# Altium PCB PCB1.PcbDoc (part 4 of 5)
Units mm, origin at the board's own origin, x right, y up, seen from the top; angles counter-clockwise.
Board outline 50 x 70 mm, 6 copper layers (Top Layer, L2, L3, L4, L5, Bottom Layer), stack 1.232 mm thick; 119 components, 75 nets, 612 pads, 243 vias.
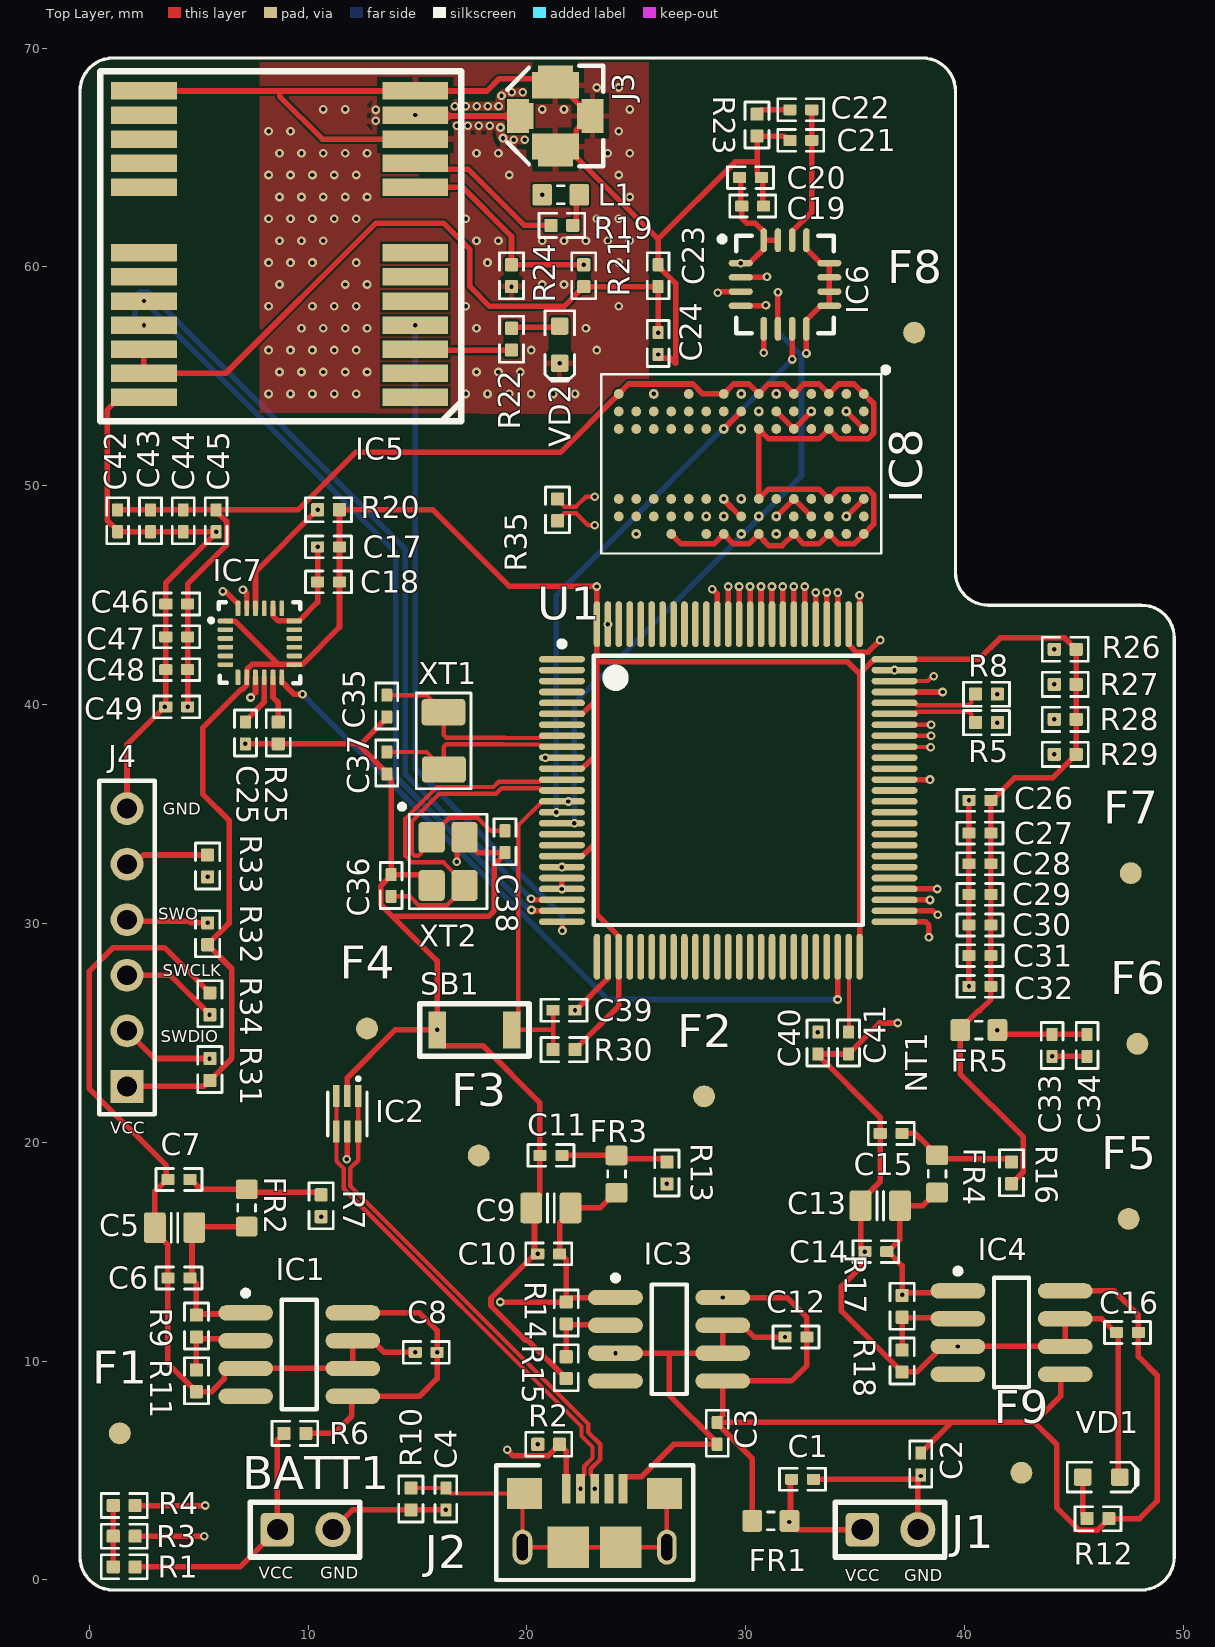
[diagram p0: Top Layer view]

## Part data (continued)
R15 R18: library part Res, "Res Thick Film 0402 5.9K Ohm 1% 0.063W ±100ppm/°C Molded SMD Paper T/R", Case Code (Imperial)=0402, Case Code (Metric)=1005, Manufacturer="Stackpole Electronics", Manufacturer Part Number=RMCF0402FT5K90, Max Operating Temperature=155°C, Max Power Dissipation=63mW, Min Operating Temperature=-55°C, Ratings=AEC-Q200, Temperature Coefficient=100ppm/°C, Tolerance=1%, Voltage Rating=50V, Case/Package=0402, Category="Chip SMD Resistors", China RoHS=Non-Compliant, ComponentLink1Description=https://datasheet.octopart.com:443/RMCF0402FT5K90-Stackpole-Electronics-datasheet-182148065.pdf?src-supplier=IHS, ComponentLink1URL=https://datasheet.octopart.com:443/RMCF0402FT5K90-Stackpole-Electronics-datasheet-182148065.pdf?src-supplier=IHS, ComponentLink2Description=https://datasheet.octopart.com:443/RMCF0402FT5K90-Stackpole-Electronics-datasheet-28504820.pdf?src-supplier=Upverter, ComponentLink2URL=https://datasheet.octopart.com:443/RMCF0402FT5K90-Stackpole-Electronics-datasheet-28504820.pdf?src-supplier=Upverter, ComponentLink3Description=https://datasheet.octopart.com:443/RMCF0402FT5K90-Stackpole-Electronics-datasheet-141193804.pdf?src-supplier=Master+Electronics, ComponentLink3URL=https://datasheet.octopart.com:443/RMCF0402FT5K90-Stackpole-Electronics-datasheet-141193804.pdf?src-supplier=Master+Electronics, ComponentLink4Description=https://datasheet.octopart.com:443/RMCF0402FT5K90-Stackpole-Electronics-datasheet-116606903.pdf?src-supplier=Master+Electronics, ComponentLink4URL=https://datasheet.octopart.com:443/RMCF0402FT5K90-Stackpole-Electronics-datasheet-116606903.pdf?src-supplier=Master+Electronics, ComponentLink5Description=https://datasheet.octopart.com:443/RMCF0402FT5K90-Stackpole-Electronics-datasheet-189104163.pdf?src-supplier=Master+Electronics, ComponentLink5URL=https://datasheet.octopart.com:443/RMCF0402FT5K90-Stackpole-Electronics-datasheet-189104163.pdf?src-supplier=Master+Electronics, ComponentLink6Description=https://datasheet.octopart.com:443/RMCF0402FT5K90-Stackpole-Electronics-datasheet-62091608.pdf?src-supplier=Stackpole+Electronics, ComponentLink6URL=https://datasheet.octopart.com:443/RMCF0402FT5K90-Stackpole-Electronics-datasheet-62091608.pdf?src-supplier=Stackpole+Electronics, ComponentLink7Description=https://datasheet.octopart.com:443/RMCF0402FT5K90-Stackpole-Electronics-datasheet-12534581.pdf?src-supplier=Stackpole+Electronics, ComponentLink7URL=https://datasheet.octopart.com:443/RMCF0402FT5K90-Stackpole-Electronics-datasheet-12534581.pdf?src-supplier=Stackpole+Electronics, ComponentLink8Description=https://datasheet.octopart.com:443/RMCF0402FT5K90-Stackpole-Electronics-datasheet-10788263.pdf?src-supplier=Stackpole+Electronics, ComponentLink8URL=https://datasheet.octopart.com:443/RMCF0402FT5K90-Stackpole-Electronics-datasheet-10788263.pdf?src-supplier=Stackpole+Electronics, ComponentLink9Description=http://sigma.octopart.com:80/15940719/materials_sheet/Stackpole-Electronics-RMCF0402FT5K90.pdf?src-supplier=Compliance+Statements, ComponentLink9URL=http://sigma.octopart.com:80/15940719/materials_sheet/Stackpole-Electronics-RMCF0402FT5K90.pdf?src-supplier=Compliance+Statements, ComponentLink10Description=http://sigma.octopart.com:80/141158211/reach_statement/Stackpole-Electronics-RMCF0402FT5K90.pdf?src-supplier=Compliance+Statements, ComponentLink10URL=http://sigma.octopart.com:80/141158211/reach_statement/Stackpole-Electronics-RMCF0402FT5K90.pdf?src-supplier=Compliance+Statements, ComponentLink11Description=http://sigma.octopart.com:80/141158212/rohs_statement/Stackpole-Electronics-RMCF0402FT5K90.pdf?src-supplier=Compliance+Statements, ComponentLink11URL=http://sigma.octopart.com:80/141158212/rohs_statement/Stackpole-Electronics-RMCF0402FT5K90.pdf?src-supplier=Compliance+Statements, Composition="Thick Film", Contact Plating=Tin, Country of Origin="Japan, Mainland China, Taiwan", Export Control Classification Number (ECCN) Code=EAR99, Features="Automotive AEC-Q200", Harmonized Tariff Schedule (HTS) Code=8533.21.00.30, Height=300µm, Introduction Date=2011-01-07, Lead Free="Lead Free", Length=1mm, Lifecycle Status=Production, Mounting Technology="Surface Mount", Number of Terminals=2, Number of Terminations=2, Packaging="Cut Tape (CT)", Power Rating=63mW, Pricing="1=0.044, 10=0.0049, 25=0.003, 100=0.0026, 250=0.0022, 500=0.0017, 3000=0.0014, 6000=0.0008 (USD)", Radiation Hardening=No, REACH SVHC=Yes, RoHS=Compliant, Schedule B="8533210045, 8533210045|8533210045|8533210045|8533210045|8533210045", Stock=6359, Supplier="Arrow Electronics", Supplier Part Number=RMCF0402FT5K90, Width=500µm, Working Voltage=50V
R19: library part Res, "Res Thick Film 0402 10 Ohm 1% 0.063W(1/16W) ±100ppm/C Pad SMD Automotive T/R", Case Code (Imperial)=0402, Case Code (Metric)=1005, Manufacturer="Stackpole Electronics", Manufacturer Part Number=RMCF0402FT10R0, Max Operating Temperature=155°C, Max Power Dissipation=63mW, Min Operating Temperature=-55°C, Ratings=AEC-Q200, Temperature Coefficient=100ppm/°C, Tolerance=1%, Voltage Rating=50V, Case/Package=0402, Category="Chip SMD Resistors", China RoHS=Non-Compliant, ComponentLink1Description=https://datasheet.octopart.com:443/RMCF0402FT10R0-Stackpole-Electronics-datasheet-182148065.pdf?src-supplier=IHS, ComponentLink1URL=https://datasheet.octopart.com:443/RMCF0402FT10R0-Stackpole-Electronics-datasheet-182148065.pdf?src-supplier=IHS, ComponentLink2Description=https://datasheet.octopart.com:443/RMCF0402FT10R0-Stackpole-Electronics-datasheet-141193804.pdf?src-supplier=Master+Electronics, ComponentLink2URL=https://datasheet.octopart.com:443/RMCF0402FT10R0-Stackpole-Electronics-datasheet-141193804.pdf?src-supplier=Master+Electronics, ComponentLink3Description=https://datasheet.octopart.com:443/RMCF0402FT10R0-Stackpole-Electronics-datasheet-189104163.pdf?src-supplier=Master+Electronics, ComponentLink3URL=https://datasheet.octopart.com:443/RMCF0402FT10R0-Stackpole-Electronics-datasheet-189104163.pdf?src-supplier=Master+Electronics, ComponentLink4Description=https://datasheet.octopart.com:443/RMCF0402FT10R0-Stackpole-Electronics-datasheet-116606903.pdf?src-supplier=Master+Electronics, ComponentLink4URL=https://datasheet.octopart.com:443/RMCF0402FT10R0-Stackpole-Electronics-datasheet-116606903.pdf?src-supplier=Master+Electronics, ComponentLink5Description=https://datasheet.octopart.com:443/RMCF0402FT10R0-Stackpole-Electronics-datasheet-62091608.pdf?src-supplier=Upverter, ComponentLink5URL=https://datasheet.octopart.com:443/RMCF0402FT10R0-Stackpole-Electronics-datasheet-62091608.pdf?src-supplier=Upverter, ComponentLink6Description=https://datasheet.octopart.com:443/RMCF0402FT10R0-Stackpole-Electronics-datasheet-28504820.pdf?src-supplier=Upverter, ComponentLink6URL=https://datasheet.octopart.com:443/RMCF0402FT10R0-Stackpole-Electronics-datasheet-28504820.pdf?src-supplier=Upverter, ComponentLink7Description=https://datasheet.octopart.com:443/RMCF0402FT10R0-Stackpole-Electronics-datasheet-12534581.pdf?src-supplier=Stackpole+Electronics, ComponentLink7URL=https://datasheet.octopart.com:443/RMCF0402FT10R0-Stackpole-Electronics-datasheet-12534581.pdf?src-supplier=Stackpole+Electronics, ComponentLink8Description=https://datasheet.octopart.com:443/RMCF0402FT10R0-Stackpole-Electronics-datasheet-10788263.pdf?src-supplier=Stackpole+Electronics, ComponentLink8URL=https://datasheet.octopart.com:443/RMCF0402FT10R0-Stackpole-Electronics-datasheet-10788263.pdf?src-supplier=Stackpole+Electronics, ComponentLink9Description=https://datasheet.octopart.com:443/RMCF0402FT10R0-Stackpole-Electronics-datasheet-12510902.pdf?src-supplier=Future+Electronics, ComponentLink9URL=https://datasheet.octopart.com:443/RMCF0402FT10R0-Stackpole-Electronics-datasheet-12510902.pdf?src-supplier=Future+Electronics, ComponentLink10Description=http://sigma.octopart.com:80/15940719/materials_sheet/Stackpole-Electronics-RMCF0402FT10R0.pdf?src-supplier=Compliance+Statements, ComponentLink10URL=http://sigma.octopart.com:80/15940719/materials_sheet/Stackpole-Electronics-RMCF0402FT10R0.pdf?src-supplier=Compliance+Statements, ComponentLink11Description=http://sigma.octopart.com:80/141158211/reach_statement/Stackpole-Electronics-RMCF0402FT10R0.pdf?src-supplier=Compliance+Statements, ComponentLink11URL=http://sigma.octopart.com:80/141158211/reach_statement/Stackpole-Electronics-RMCF0402FT10R0.pdf?src-supplier=Compliance+Statements, ComponentLink12Description=http://sigma.octopart.com:80/141158212/rohs_statement/Stackpole-Electronics-RMCF0402FT10R0.pdf?src-supplier=Compliance+Statements, ComponentLink12URL=http://sigma.octopart.com:80/141158212/rohs_statement/Stackpole-Electronics-RMCF0402FT10R0.pdf?src-supplier=Compliance+Statements, Composition="Thick Film", Contact Plating=Tin, Country of Origin="Japan, Mainland China, Taiwan", Depth=500µm, Export Control Classification Number (ECCN) Code=EAR99, Features="Automotive AEC-Q200", Harmonized Tariff Schedule (HTS) Code=8533.21.00.30, Height=300µm, Introduction Date=2011-01-07, Lead Free="Lead Free", Length=1mm, Lifecycle Status=Production, Military Standard=Not, Mounting Technology="Surface Mount", Number of Terminals=2, Number of Terminations=2, Packaging="Cut Tape (CT)", Power Rating=63mW, Pricing="60000=0.0016 (USD)", Radiation Hardening=No, REACH SVHC=Yes, RoHS=Compliant, Schedule B="8533210045, 8533210045|8533210045|8533210045|8533210045|8533210045|8533210045|8533210045|8533210045|8533210045|8533210045|8533210045|8533210045|8533210045|8533210045|8533210045|8533210045|8533210045|8533210045|8533210045|8533210045|8533210045|8533210045|8533210045|85", Stock=180000, Supplier="Arrow Electronics", Supplier Part Number=RMCF0402FT10R0, Width=500µm, Working Voltage=50V
R35: library part Res, "Res Thick Film 0402 100 Ohm 1% 0.063W(1/16W) ±100ppm/C Pad SMD Automotive T/R", Case Code (Imperial)=0402, Case Code (Metric)=1005, Manufacturer="Stackpole Electronics", Manufacturer Part Number=RMCF0402FT100R, Max Operating Temperature=155°C, Max Power Dissipation=63mW, Min Operating Temperature=-55°C, Ratings=AEC-Q200, Temperature Coefficient=100ppm/°C, Tolerance=1%, Voltage Rating=50V, Case/Package=0402, Category="Chip SMD Resistors", China RoHS=Non-Compliant, ComponentLink1Description=https://datasheet.octopart.com:443/RMCF0402FT100R-Stackpole-Electronics-datasheet-182148065.pdf?src-supplier=IHS, ComponentLink1URL=https://datasheet.octopart.com:443/RMCF0402FT100R-Stackpole-Electronics-datasheet-182148065.pdf?src-supplier=IHS, ComponentLink2Description=https://datasheet.octopart.com:443/RMCF0402FT100R-Stackpole-Electronics-datasheet-141193804.pdf?src-supplier=Upverter, ComponentLink2URL=https://datasheet.octopart.com:443/RMCF0402FT100R-Stackpole-Electronics-datasheet-141193804.pdf?src-supplier=Upverter, ComponentLink3Description=https://datasheet.octopart.com:443/RMCF0402FT100R-Stackpole-Electronics-datasheet-62091608.pdf?src-supplier=Upverter, ComponentLink3URL=https://datasheet.octopart.com:443/RMCF0402FT100R-Stackpole-Electronics-datasheet-62091608.pdf?src-supplier=Upverter, ComponentLink4Description=https://datasheet.octopart.com:443/RMCF0402FT100R-Stackpole-Electronics-datasheet-28504820.pdf?src-supplier=Upverter, ComponentLink4URL=https://datasheet.octopart.com:443/RMCF0402FT100R-Stackpole-Electronics-datasheet-28504820.pdf?src-supplier=Upverter, ComponentLink5Description=https://datasheet.octopart.com:443/RMCF0402FT100R-Stackpole-Electronics-datasheet-12534581.pdf?src-supplier=Stackpole+Electronics, ComponentLink5URL=https://datasheet.octopart.com:443/RMCF0402FT100R-Stackpole-Electronics-datasheet-12534581.pdf?src-supplier=Stackpole+Electronics, ComponentLink6Description=https://datasheet.octopart.com:443/RMCF0402FT100R-Stackpole-Electronics-datasheet-10788263.pdf?src-supplier=Stackpole+Electronics, ComponentLink6URL=https://datasheet.octopart.com:443/RMCF0402FT100R-Stackpole-Electronics-datasheet-10788263.pdf?src-supplier=Stackpole+Electronics, ComponentLink7Description=https://datasheet.octopart.com:443/RMCF0402FT100R-Stackpole-Electronics-datasheet-155966809.pdf?src-supplier=Electro+Sonic, ComponentLink7URL=https://datasheet.octopart.com:443/RMCF0402FT100R-Stackpole-Electronics-datasheet-155966809.pdf?src-supplier=Electro+Sonic, ComponentLink8Description=https://datasheet.octopart.com:443/RMCF0402FT100R-Stackpole-Electronics-datasheet-189104164.pdf?src-supplier=Master+Electronics, ComponentLink8URL=https://datasheet.octopart.com:443/RMCF0402FT100R-Stackpole-Electronics-datasheet-189104164.pdf?src-supplier=Master+Electronics, ComponentLink9Description=https://datasheet.octopart.com:443/RMCF0402FT100R-Stackpole-Electronics-datasheet-154799224.pdf?src-supplier=Master+Electronics, ComponentLink9URL=https://datasheet.octopart.com:443/RMCF0402FT100R-Stackpole-Electronics-datasheet-154799224.pdf?src-supplier=Master+Electronics, ComponentLink10Description=https://datasheet.octopart.com:443/RMCF0402FT100R-Stackpole-Electronics-datasheet-11547379.pdf?src-supplier=Arrow+Electronics, ComponentLink10URL=https://datasheet.octopart.com:443/RMCF0402FT100R-Stackpole-Electronics-datasheet-11547379.pdf?src-supplier=Arrow+Electronics, ComponentLink11Description=http://sigma.octopart.com:80/15940719/materials_sheet/Stackpole-Electronics-RMCF0402FT100R.pdf?src-supplier=Compliance+Statements, ComponentLink11URL=http://sigma.octopart.com:80/15940719/materials_sheet/Stackpole-Electronics-RMCF0402FT100R.pdf?src-supplier=Compliance+Statements, ComponentLink12Description=http://sigma.octopart.com:80/141158212/rohs_statement/Stackpole-Electronics-RMCF0402FT100R.pdf?src-supplier=Compliance+Statements, ComponentLink12URL=http://sigma.octopart.com:80/141158212/rohs_statement/Stackpole-Electronics-RMCF0402FT100R.pdf?src-supplier=Compliance+Statements, ComponentLink13Description=http://sigma.octopart.com:80/141158211/reach_statement/Stackpole-Electronics-RMCF0402FT100R.pdf?src-supplier=Compliance+Statements, ComponentLink13URL=http://sigma.octopart.com:80/141158211/reach_statement/Stackpole-Electronics-RMCF0402FT100R.pdf?src-supplier=Compliance+Statements, Composition="Thick Film", Contact Plating=Tin, Country of Origin="Japan, Mainland China, Taiwan", Depth=500µm, Export Control Classification Number (ECCN) Code=EAR99, Features="Automotive AEC-Q200", Harmonized Tariff Schedule (HTS) Code=8533.21.00.30, Height=300µm, Introduction Date=2011-01-07, Lead Free="Lead Free", Length=1mm, Lifecycle Status=Production, Military Standard=Not, Mounting Technology="Surface Mount", Number of Terminals=2, Number of Terminations=2, Packaging="Cut Tape (CT)", Power Rating=63mW, Pricing="60000=0.0016 (USD)", REACH SVHC=Yes, RoHS=Compliant, Schedule B="8533210045, 8533210045|8533210045, 8533210045|8533210045|8533210045, 8533210045|8533210045|8533210045|8533210045", Stock=280000, Supplier="Arrow Electronics", Supplier Part Number=RMCF0402FT100R, Width=500µm, Working Voltage=50V
SB1: "Switch Tactile N.O. SPST Round Button Solder Tab 12VDC 200000Cycles 1.5N SMD Emboss T/R", Ambient Temperature Range High=70°C, Color=Silver, Contact Current Rating=50mA, Contact Resistance=100mΩ, Insulation Resistance=100MΩ, Manufacturer=Omron, Manufacturer Package Identifier=B3U-1000P(M), Manufacturer Part Number=B3U-1000P, Max Voltage Rating (DC)=12V, Min Operating Temperature=-25°C, Operating Force=1.99N, Ratings="Dust Proof, IP40", Supplier Part Number=SW1020CT-ND, Actuator Length=400µm, Category="Tactile Switches", ComponentLink1Description=https://datasheet.octopart.com:443/B3U-1000P-Omron-datasheet-62106914.pdf?src-supplier=IHS, ComponentLink1URL=https://datasheet.octopart.com:443/B3U-1000P-Omron-datasheet-62106914.pdf?src-supplier=IHS, ComponentLink2Description=https://datasheet.octopart.com:443/B3U-1000P-Omron-datasheet-10910421.pdf?src-supplier=RS+(Formerly+Allied+Electronics), ComponentLink2URL=https://datasheet.octopart.com:443/B3U-1000P-Omron-datasheet-10910421.pdf?src-supplier=RS+(Formerly+Allied+Electronics), ComponentLink3Description=https://datasheet.octopart.com:443/B3U-1000P-Omron-datasheet-5458533.pdf?src-supplier=Upverter, ComponentLink3URL=https://datasheet.octopart.com:443/B3U-1000P-Omron-datasheet-5458533.pdf?src-supplier=Upverter, ComponentLink4Description=https://datasheet.octopart.com:443/B3U-1000P-Omron-datasheet-11968313.pdf?src-supplier=SOS+electronic, ComponentLink4URL=https://datasheet.octopart.com:443/B3U-1000P-Omron-datasheet-11968313.pdf?src-supplier=SOS+electronic, ComponentLink5Description=https://datasheet.octopart.com:443/B3U-1000P-Omron-datasheet-110759174.pdf?src-supplier=Newark, ComponentLink5URL=https://datasheet.octopart.com:443/B3U-1000P-Omron-datasheet-110759174.pdf?src-supplier=Newark, ComponentLink6Description=https://datasheet.octopart.com:443/B3U-1000P-Omron-datasheet-506776.pdf?src-supplier=Newark, ComponentLink6URL=https://datasheet.octopart.com:443/B3U-1000P-Omron-datasheet-506776.pdf?src-supplier=Newark, ComponentLink7Description=https://datasheet.octopart.com:443/B3U-1000P-Omron-datasheet-17589256.pdf?src-supplier=TME, ComponentLink7URL=https://datasheet.octopart.com:443/B3U-1000P-Omron-datasheet-17589256.pdf?src-supplier=TME, Contact Material=Silver, Contact Plating=Silver, Current Rating=50mA, Depth=2.5mm, Electrical Life=200kcycles, Height=1.2mm, Illumination Type="Illuminated, Non-Illuminated", Lead Free="Lead Free", Length=3mm, Life (Cycles)=200kcycles, Lifecycle Status=Production, Max Current Rating=50mA, Max Operating Temperature=70°C, Mechanical Life=200kcycles, Mounting Technology="Surface Mount", Number of Positions=1, Packaging="Tape and Reel", Pins=2, Pricing="1=1.17, 10=0.997, 25=0.9268, 100=0.8261, 250=0.76544, 500=0.72342, 1000=0.68504 (USD)", REACH SVHC=Yes, RoHS=Compliant, Sealable="DUST PROOF", Stock=119444, Supplier=DigiKey, Switch Function=Off-Mom, Switch Travel=150µm, Termination=SMD/SMT, Throw Configuration=SPST, Voltage Rating (DC)=12V, Weight=21.99923mg, Width=2.5mm
U1: "ARM Cortex-M4 32-bit MCU+FPU, 210 DMIPS, 2048 kB Flash, 256 kB Internal RAM, 82 I/Os, 100-pin LQFP, -40 to 85 degC, Tray", I/Os (High Current)=82, Manufacturer=STMicroelectronics, Operating Frequency(F) (Processor speed) (MHz)=168, Supplier Part Number 1=497-14049-ND, Supply Voltage(Vcc) max (V)=3.6, Supply Voltage(Vcc) min (V)=1.8, ComponentLink1Description="Manufacturer URL", ComponentLink1URL=http://www.st.com/web/en/home.html, ComponentLink2Description=Datasheet, ComponentLink2URL=http://www.st.com/st-web-ui/static/active/en/resource/technical/document/datasheet/DM00071990.pdf, ComponentLink3Description="Package Specification", ComponentLink3URL=http://www.st.com/st-web-ui/static/active/en/resource/technical/document/data_brief/DM00071938.pdf, Core="ARM Cortex-M4", D/A Converter=2x12-bit, DatasheetVersion="Rev. 1", FLASH Size (Prog) (kB)=2048, Internal RAM Size (kB)=256, Mounting Technology="Surface Mount", PackageDescription="100-Pin Low Profile Quad Flat Package, 14 x 14 mm Body, 0.5 mm Pitch", PackageReference=LQFP100, PackageVersion="Rev. 1, 06/2013", Packing=Tray, PartNumber=STM32F427VIT6, Supplier 1=Digi-Key, Supplier 2=Farnell, Supplier 3=Newark, Supplier 4=Newark, Supplier 5=Mouser, Supplier Part Number 2=2333369, Supplier Part Number 3=99W9927, Supplier Part Number 4=66W7312, Supplier Part Number 5=511-STM32F427VIT6
VD1 VD2: "Light Emitting Diode/LED 0603 super bright Yellow green 568nm 12mcd paste", Case/Package=0603, Color=Green, Forward Current=25mA, Forward Voltage=2.2V, Lens Color=Clear, Manufacturer=Kingbright, Manufacturer Part Number=KPT-1608SGC, Max Junction Temperature (Tj)=110°C, Max Operating Temperature=85°C, Min Operating Temperature=-40°C, Power Dissipation=62.5mW, Reverse Voltage=5V, Category=LEDs, China RoHS=Compliant, ComponentLink1Description=https://datasheet.octopart.com:443/KPT-1608SGC-Kingbright-datasheet-180521090.pdf?src-supplier=IHS, ComponentLink1URL=https://datasheet.octopart.com:443/KPT-1608SGC-Kingbright-datasheet-180521090.pdf?src-supplier=IHS, ComponentLink2Description=https://datasheet.octopart.com:443/KPT-1608SGC-Kingbright-datasheet-180510520.pdf?src-supplier=IHS, ComponentLink2URL=https://datasheet.octopart.com:443/KPT-1608SGC-Kingbright-datasheet-180510520.pdf?src-supplier=IHS, ComponentLink3Description=https://datasheet.octopart.com:443/KPT-1608SGC-Kingbright-datasheet-138896655.pdf?src-supplier=Upverter, ComponentLink3URL=https://datasheet.octopart.com:443/KPT-1608SGC-Kingbright-datasheet-138896655.pdf?src-supplier=Upverter, ComponentLink4Description=https://datasheet.octopart.com:443/KPT-1608SGC-Kingbright-datasheet-62316560.pdf?src-supplier=element14+APAC, ComponentLink4URL=https://datasheet.octopart.com:443/KPT-1608SGC-Kingbright-datasheet-62316560.pdf?src-supplier=element14+APAC, ComponentLink5Description=https://datasheet.octopart.com:443/KPT-1608SGC-Kingbright-datasheet-10923609.pdf?src-supplier=element14+APAC, ComponentLink5URL=https://datasheet.octopart.com:443/KPT-1608SGC-Kingbright-datasheet-10923609.pdf?src-supplier=element14+APAC, ComponentLink6Description=https://datasheet.octopart.com:443/KPT-1608SGC-Kingbright-datasheet-133513926.pdf?src-supplier=TME, ComponentLink6URL=https://datasheet.octopart.com:443/KPT-1608SGC-Kingbright-datasheet-133513926.pdf?src-supplier=TME, ComponentLink7Description=https://datasheet.octopart.com:443/KPT-1608SGC-Kingbright-datasheet-104959244.pdf?src-supplier=TME, ComponentLink7URL=https://datasheet.octopart.com:443/KPT-1608SGC-Kingbright-datasheet-104959244.pdf?src-supplier=TME, ComponentLink8Description=https://datasheet.octopart.com:443/KPT-1608SGC-Kingbright-datasheet-8328416.pdf?src-supplier=Sager+Electronics, ComponentLink8URL=https://datasheet.octopart.com:443/KPT-1608SGC-Kingbright-datasheet-8328416.pdf?src-supplier=Sager+Electronics, Country of Origin="Mainland China", Dominant Wavelength=568nm, Harmonized Tariff Schedule (HTS) Code=8541.40.20.00, Height=750µm, Introduction Date=1999-05-04, Lens Style="Colorless, Diffused, Rectangular", Lifecycle Status=Production, Luminous Intensity=15mcd, Mounting Technology="Surface Mount", Number of Circuits=1, Number of LEDs=1, Number of Terminals=2, Packaging="Cut Tape", Peak Wavelength=565nm, Pins=2, Pricing="2000=0.07, 6000=0.0686 (EUR)", Radiation Hardening=No, REACH SVHC=Yes, RoHS=Compliant, Shape=Rectangular, Stock=18000, Supplier=Farnell, Supplier Part Number=KPT-1608SGC, Terminal Pitch=1.65mm, Viewing Angle=120°, Wavelength=568nm